# Altium PCB RF_v2.PcbDoc (part 2 of 4)
Units mm, origin at the board's own origin, x right, y up, seen from the top; angles counter-clockwise.
Board outline 203.1 x 72.1 mm, 2 copper layers (Top Layer, Bottom Layer), stack 1.535 mm thick; 384 components, 237 nets, 1087 pads, 1621 vias.
Unrouted connection lines stored in the file: 4.
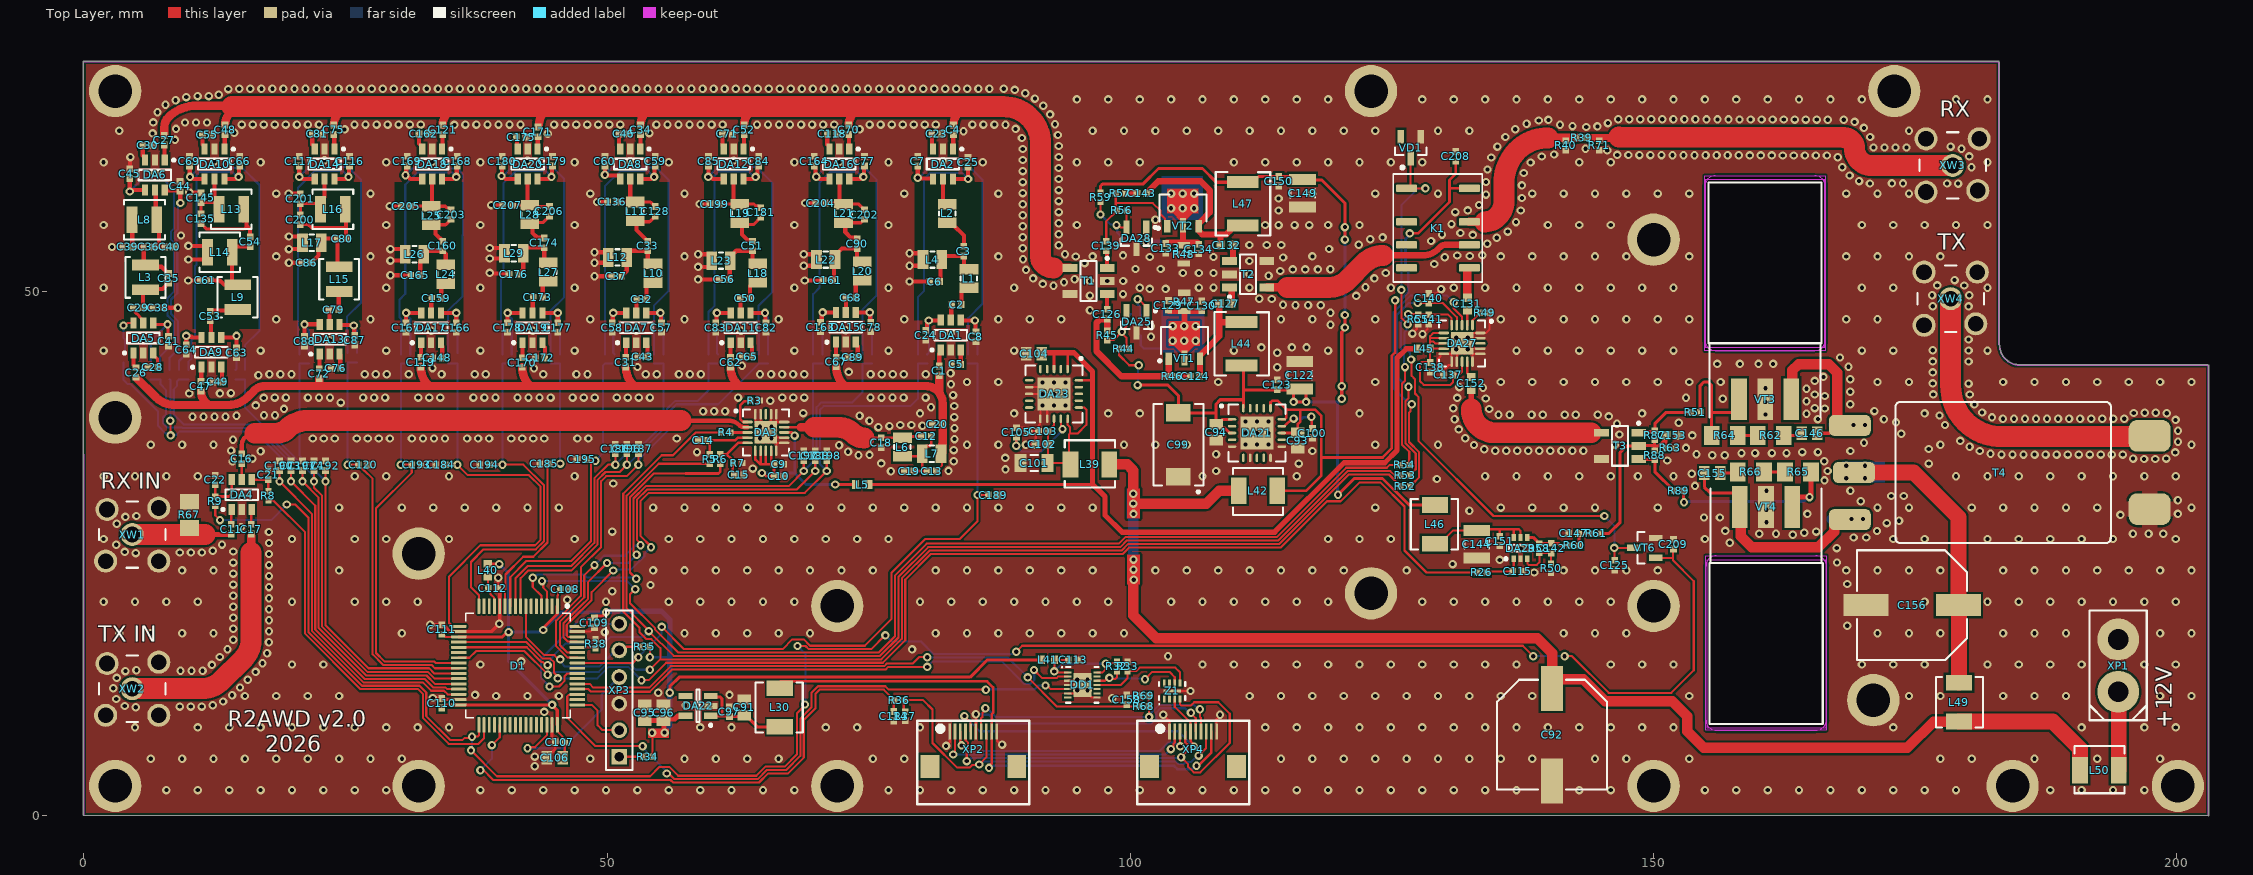
[diagram p0: Top Layer view]

## Part data (continued)
XW1 XW2 XW3 XW4: library part "Соединитель коаксиальный SMA-JR", "SMA-JR Разъем SMA гнездо на плату, прямой угол", ComponentLink1Description=datasheet, ComponentLink1URL=http://www.brownbear.ru/goods/2243.html
Z1: library part "Фильтр EMI EClamp2394P", "ESD/EMI Protection  for Color LCD Interfaces", Manufacturer=SEMTECH, PackageReference=SLP2116P8

## Free pads (board coordinates)
  round 5 hole 3.2: 1(3,2.8) 1(3,38) 1(3,69.2) 1(32,2.8) 1(32,25) 1(72,2.8) 1(72,20) 1(123,21.2) 1(123,69.2) 1(150,2.8) 1(150,20) 1(150,55) 1(171,11) 1(173,69.2) 1(184.3,2.8) 1(200.1,2.8)

## Via types
v1: diameter 0.8, hole 0.4, Top Layer to Bottom Layer, tented both sides, 1579 vias
v2: diameter 0.8, hole 0.4, Top Layer to Bottom Layer, 42 vias

## Nets (pads, with @x,y where several pads share a name; then routed paths per layer and width w, separated by ;. In a path a pad name is that pad's centre, name@x,y a point inside that pad or via, vN(x,y) a via of type N, cw(c..) or ccw(c..) an arc to the next point about the centre after c; other vN are vias at no path point)
ATT_CLK: D1.21 R5.2 R53.2 | length 127
  Top Layer w0.2: D1.21@35.83,16.05 42.331,16.05 43.734,14.647 43.863,14.647 44.163,14.347 v1(44.325,14.347) ; v1(53.992,17.598) 53.992,17.649 51.875,19.765 51.875,30.535 54.926,33.586 R5.2@59.815,33.586 ; v1@54,17.6 56.375,15.225 66.672,15.225 75.504,15.225 76.085,15.225 77.85,16.99 77.85,22.789 80.686,25.625 81.004,25.625 99.032,25.625 99.657,26.25 114.123,26.25 120.756,32.883 124.851,32.883 125.26,32.475 R53.2@125.8,32.475
  Bottom Layer w0.2: v1(44.325,14.347) 44.325,14.4 44.925,15.308 45.042,15.426 46.016,16.4 49.7,16.4 50.348,17.048 53.448,17.048 53.992,17.592 v1(53.992,17.598)
ATT_DATA: D1.23 R4.2 R52.2 | length 132.8
  Top Layer w0.2: D1.23@35.83,15.05 36.85,15.05 37.5,15.7 42.088,15.7 44.325,13.463 v1(44.325,13.422) ; v1(54.1,13.9) 55.1,14.9 ; R4.2@60.889,36.576 58.476,36.576 56.3,34.4 55.225,34.4 51.55,30.725 51.55,19.466 53.1,17.916 53.1,17.5 53.767,16.833 54.235,16.833 55.1,15.968 55.1,14.9 ; R52.2@125.825,31.45 124.717,32.558 120.891,32.558 114.257,25.925 99.791,25.925 99.166,25.3 81.138,25.3 80.821,25.3 78.175,22.654 78.175,16.856 76.219,14.9 75.638,14.9 66.538,14.9 55.524,14.9 55.1,14.9
  Bottom Layer w0.2: v1(44.325,13.422) 44.325,13.475 44.992,13.7 49.227,13.7 50.035,14.508 52.152,14.508 52.76,13.9 v1(54.1,13.9)
ATT_LE0: D1.4 R6.2 | length 31.7
  Top Layer w0.2: v1(42.9,22.7) 42.9,21.8 43.75,20.95 D1.4@43.75,19.97 ; v1(52.8,22.6) 52.2,23.2 52.2,30.4 54.45,32.65 57.525,32.65
  Top Layer w0.25: 57.525,32.65 60.65,32.65 60.831,32.831 R6.2@60.831,33.586
  Bottom Layer w0.2: v1(42.9,22.7) 43.062,22.7 43.362,23 47.8,23 48.1,22.7 52.7,22.7 v1(52.8,22.6)
ATT_LE1: D1.3 R54.2 | length 99.8
  Top Layer w0.2: v1(43.789,22.375) 43.904,22.26 43.904,21.744 44.25,21.398 D1.3@44.25,19.97 ; v1(52.7,21.6) 52.2,21.1 52.2,20.274 54.6,17.874 54.6,17.741 56.791,15.55 66.807,15.55 75.95,15.55 77.525,17.125 77.525,22.923 80.552,25.95 80.869,25.95 98.897,25.95 99.522,26.575 113.988,26.575 120.621,33.208 124.514,33.208 124.78,33.475 R54.2@125.75,33.475
  Bottom Layer w0.2: v1(43.789,22.375) 51.925,22.375 v1(52.7,21.6)
BAND0_DIS: C190.2 D1.30 R13.2 R14.1 | length 61.7
  Top Layer w0.2: v1(8.26,37.703) 8.28,37.683 8.28,36.32 v1(8.3,36.3) ; C190.2@18.7,32.94 v1(18.7,31.9) 21.8,28.8 21.8,17.619 26.719,12.7 32.4,12.7 33.2,11.9 34.418,11.9 34.768,11.55 D1.30@35.83,11.55
  Bottom Layer w0.2: R13.2@3.8,43.25 3.8,41.6 4.2,41.2 4.5,41.2 7.1,38.6 7.1,37.2 7.805,36.495 7.943,36.495 8.138,36.3 8.183,36.345 8.845,36.345 9.186,36.686 16.314,36.686 18.7,34.3 v1(18.7,31.9) ; R14.1@8.2,41.65 8.275,41.575 8.275,37.717 v1(8.26,37.703)